# Altium PCB TYPEC_4KRECEIVER-v1.0.PcbDoc (part 5 of 12)
Units mil, origin at the board's own origin, x right, y up, seen from the top; angles counter-clockwise.
Board outline 2834.7 x 1259.84 mil, 10 copper layers (Top Layer, GND-1, Signal L1, GND-2, PWR-1, PWR-2, GND-3, Signal L2, GND-4, Bottom Layer), stack 61.686 mil thick; 492 components, 339 nets, 2214 pads, 1169 vias.
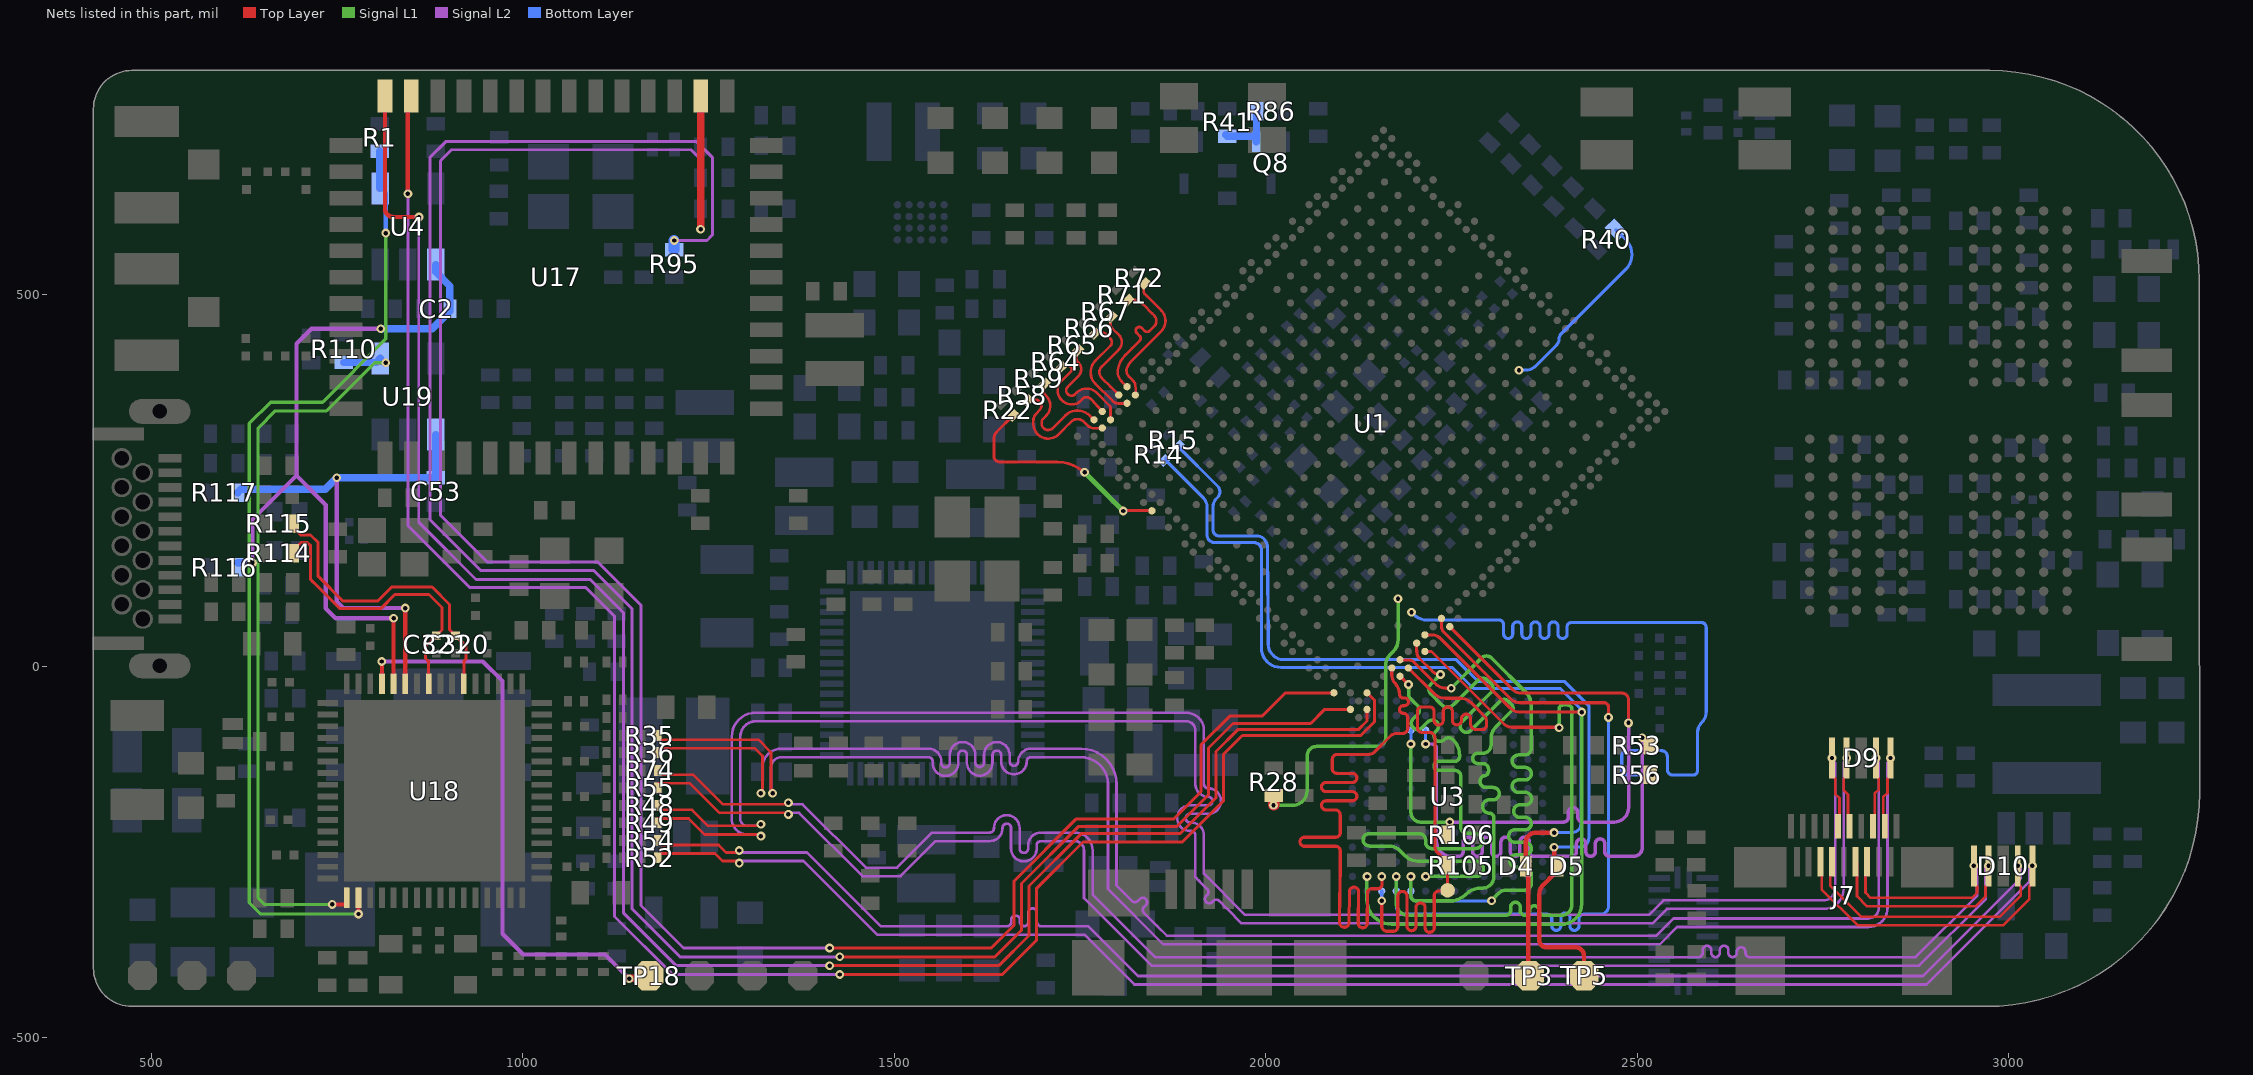
[diagram p11: the nets of this part, all layers, seen from the top]

## Part data (continued)
R100: library part RC0402FR-072KL, "RES 2K OHM 1% 1/16W 0402", Case Code (Imperial)=0402, Case Code (Metric)=1005, LCSC Part Number=C60488, Manufacturer=Yageo, Max Operating Temperature=155°C, Max Power Dissipation=63mW, Min Operating Temperature=-55°C, Package Quantity=1, Resistance Tolerance=1%, Resistor Type="Thick Film", Supplier Part Number=7970452, Temperature Coefficient=100ppm/°C, Voltage Rating=50V, Case/Package=0402, Category="Chip SMD Resistors", ComponentLink1Description=https://datasheet.ciiva.com/11808/0900766b80c66297-11808787.pdf?src-supplier=Rs, ComponentLink1URL=https://datasheet.ciiva.com/11808/0900766b80c66297-11808787.pdf?src-supplier=Rs, ComponentLink2Description=https://datasheet.ciiva.com/11808/0900766b80c66297-11808787.pdf?src-supplier=Rs, ComponentLink2URL=https://datasheet.ciiva.com/11808/0900766b80c66297-11808787.pdf?src-supplier=Rs, ComponentLink3Description=https://datasheet.ciiva.com/7849/1018594-7849934.pdf?src-supplier=Element14, ComponentLink3URL=https://datasheet.ciiva.com/7849/1018594-7849934.pdf?src-supplier=Element14, ComponentLink4Description=https://datasheet.ciiva.com/7849/1018594-7849935.pdf?src-supplier=Element14, ComponentLink4URL=https://datasheet.ciiva.com/7849/1018594-7849935.pdf?src-supplier=Element14, ComponentLink5Description=https://datasheet.ciiva.com/7983/1018594-7983517.pdf?src-supplier=Element14, ComponentLink5URL=https://datasheet.ciiva.com/7983/1018594-7983517.pdf?src-supplier=Element14, ComponentLink6Description=https://datasheet.ciiva.com/2453/pyu-r-int-thick-7-2453635.pdf?src-supplier=Digi-Key, ComponentLink6URL=https://datasheet.ciiva.com/2453/pyu-r-int-thick-7-2453635.pdf?src-supplier=Digi-Key, ComponentLink7Description=https://datasheet.ciiva.com/2453/pyu-r-int-thick-7-2453636.pdf?src-supplier=Digi-Key, ComponentLink7URL=https://datasheet.ciiva.com/2453/pyu-r-int-thick-7-2453636.pdf?src-supplier=Digi-Key, ComponentLink8Description=https://datasheet.ciiva.com/2453/pyu-r-int-thick-7-2453634.pdf?src-supplier=Digi-Key, ComponentLink8URL=https://datasheet.ciiva.com/2453/pyu-r-int-thick-7-2453634.pdf?src-supplier=Digi-Key, ComponentLink9Description=https://datasheet.ciiva.com/12667/pyu-rc0402-51-rohs-l-6-r-12667451.pdf?src-supplier=Mouser, ComponentLink9URL=https://datasheet.ciiva.com/12667/pyu-rc0402-51-rohs-l-6-r-12667451.pdf?src-supplier=Mouser, ComponentLink10Description=https://datasheet.ciiva.com/15189/getdatasheetpartid-358921-15189414.pdf?src-supplier=Verical, ComponentLink10URL=https://datasheet.ciiva.com/15189/getdatasheetpartid-358921-15189414.pdf?src-supplier=Verical, ComponentLink11Description=https://datasheet.ciiva.com/2453/pyu-r-int-thick-7-2453635.pdf?src-supplier=Digikey, ComponentLink11URL=https://datasheet.ciiva.com/2453/pyu-r-int-thick-7-2453635.pdf?src-supplier=Digikey, ComponentLink12Description=https://datasheet.ciiva.com/2453/pyu-r-int-thick-7-2453636.pdf?src-supplier=Digikey, ComponentLink12URL=https://datasheet.ciiva.com/2453/pyu-r-int-thick-7-2453636.pdf?src-supplier=Digikey, ComponentLink13Description=https://datasheet.ciiva.com/2453/pyu-r-int-thick-7-2453634.pdf?src-supplier=Digikey, ComponentLink13URL=https://datasheet.ciiva.com/2453/pyu-r-int-thick-7-2453634.pdf?src-supplier=Digikey, Construction=Rectangular, Depth=0.5mm, Features="Moisture Resistant", Height=0.016inch, Item Type=Resistor, Lead Free=5697LeadFree, Length=0.039inch, Manufacturer Part Number=RC0402FR-072KL, Military Standard=Not, Number of Terminations=2, Packaging="Tape and Reel", Power Rating=63mW, Pricing="10000=0.0018, 100000=0.0011, 200000=0.0017, 300000=0.001, 750000=0.0016, 2000000=0.0009, 2500000=0.0016, 10000000=0.0014 (USD)", Reach SVHC Compliant=Unknown, RoHS=Yes, RoHS Compliant=Yes, Series=RC, Stock=8530000, Supplier="Future Electronics", Technology="THICK FILM", Termination=SMD/SMT, Tolerance=1%, Voltage Rating (DC)=50V, Width=0.02inch, Working Voltage=50V
R101: library part RT0402BRD07100KL, "RES SMD 100K OHM 0.1% 1/16W 0402", LCSC Part Number=C852472, Manufacturer=Yageo, Supplier Part Number=YAG1343CT-ND, Voltage Rating (DC)=50V, Category="Chip SMD Resistors", ComponentLink1Description=https://datasheet.ciiva.com/12724/pyu-rt-1-to-0-05-rohs-l-4-12724954.pdf?src-supplier=Mouser, ComponentLink1URL=https://datasheet.ciiva.com/12724/pyu-rt-1-to-0-05-rohs-l-4-12724954.pdf?src-supplier=Mouser, Item Type=Resistor, Manufacturer Part Number=RT0402BRD07100KL, Pricing="1=0.16, 10=0.121, 50=0.0958, 100=0.0859, 500=0.0654, 1000=0.0578, 5000=0.04283 (USD)", RoHS=Yes, Stock=62932, Supplier=Digikey
R102 R103: library part RC0402FR-07240RL, "RES 240 OHM 1% 1/16W 0402", Case Code (Imperial)=0402, Case Code (Metric)=1005, Manufacturer=Yageo, Max Operating Temperature=155°C, Max Power Dissipation=63mW, Min Operating Temperature=-55°C, Package Quantity=1, Resistance Tolerance=1%, Resistor Type="Thick Film", Supplier Part Number 1=603-RC0402FR-07240RL, Temperature Coefficient=100ppm/°C, Voltage Rating=50V, Case/Package=0402, Category="Chip SMD Resistors", ComponentLink1Description=https://datasheet.ciiva.com/7849/1018594-7849915.pdf?src-supplier=Element14, ComponentLink1URL=https://datasheet.ciiva.com/7849/1018594-7849915.pdf?src-supplier=Element14, ComponentLink2Description=https://datasheet.ciiva.com/7849/1018594-7849916.pdf?src-supplier=Element14, ComponentLink2URL=https://datasheet.ciiva.com/7849/1018594-7849916.pdf?src-supplier=Element14, ComponentLink3Description=https://datasheet.ciiva.com/2519/pyu-r-int-thick-7-2519157.pdf?src-supplier=Digi-Key, ComponentLink3URL=https://datasheet.ciiva.com/2519/pyu-r-int-thick-7-2519157.pdf?src-supplier=Digi-Key, ComponentLink4Description=https://datasheet.ciiva.com/2519/pyu-r-int-thick-7-2519158.pdf?src-supplier=Digi-Key, ComponentLink4URL=https://datasheet.ciiva.com/2519/pyu-r-int-thick-7-2519158.pdf?src-supplier=Digi-Key, ComponentLink5Description=https://datasheet.ciiva.com/2519/pyu-r-int-thick-7-2519156.pdf?src-supplier=Digi-Key, ComponentLink5URL=https://datasheet.ciiva.com/2519/pyu-r-int-thick-7-2519156.pdf?src-supplier=Digi-Key, ComponentLink6Description=https://datasheet.ciiva.com/12669/pyu-rc0402-51-rohs-l-6-r-12669689.pdf?src-supplier=Mouser, ComponentLink6URL=https://datasheet.ciiva.com/12669/pyu-rc0402-51-rohs-l-6-r-12669689.pdf?src-supplier=Mouser, ComponentLink7Description=https://datasheet.ciiva.com/17419/pyu-rc0402-51-rohs-l-6-r-17419482.pdf?src-supplier=Future+Electronics, ComponentLink7URL=https://datasheet.ciiva.com/17419/pyu-rc0402-51-rohs-l-6-r-17419482.pdf?src-supplier=Future+Electronics, Construction=Rectangular, Depth=0.5mm, Features="Moisture Resistant", Height=0.016inch, Lead Free="Lead Free", Length=1mm, Manufacturer Part Number=RC0402FR-07240RL, Military Standard=Not, Number of Terminations=2, Packaging="Tape and Reel", Power Rating=63mW, Pricing 1="1=0.10000, 10=0.01200, 50=0.01200, 100=0.00500, 1000=0.00300, 10000=0.00100 (USD)", REACH SVHC=Unknown, Resistance=240R, RoHS=Yes, RoHS Compliant=Yes, Series=RC, Size Code=0402, Stock 1=1903202, Supplier 1=Mouser, Termination=SMD/SMT, Tolerance=1%, Voltage Rating (DC)=50V, Width=0.02inch
R113 R118: library part RT0402BRD07150KL, "RES 150K OHM 0.1% 1/16W 0402", LCSC Part Number=C852538, Manufacturer=Yageo, Supplier Part Number=3102901, Category="Chip SMD Resistors", Item Type=Resistor, Manufacturer Part Number=RT0402BRD07150KL, Pricing="10000=0.0218, 20000=0.0213, 30000=0.021, 50000=0.0206, 100000=0.0199 (USD)", RoHS=Yes, RoHS Compliant=Yes, Stock=20000, Supplier="Future Electronics"
R129: library part RC0402FR-076K04L, "RES 6.04K OHM 1% 1/16W 0402", Case Code (Imperial)=0402, Case Code (Metric)=1005, LCSC Part Number=C97819, Manufacturer=Yageo, Max Operating Temperature=155°C, Max Power Dissipation=63mW, Min Operating Temperature=-55°C, Package Quantity=10000, Power Rating=62.5mW, Resistance=6.04kR, Resistor Type="Thick Film", Supplier Part Number 1=603-RC0402FR-076K04L, Temperature Coefficient=100ppm/°C, Tolerance=1%, Voltage Rating=50V, Case/Package=0402, Category="Chip SMD Resistors", ComponentLink1Description=https://datasheet.ciiva.com/5558/pyu-rc0402-51-rohs-l-6-r-5558087.pdf?src-supplier=Mouser, ComponentLink1URL=https://datasheet.ciiva.com/5558/pyu-rc0402-51-rohs-l-6-r-5558087.pdf?src-supplier=Mouser, ComponentLink2Description=https://datasheet.ciiva.com/8892/pyu-rc0402-51-rohs-l-6-8892414.pdf?src-supplier=Avnet, ComponentLink2URL=https://datasheet.ciiva.com/8892/pyu-rc0402-51-rohs-l-6-8892414.pdf?src-supplier=Avnet, ComponentLink3Description=https://datasheet.ciiva.com/2552/pyu-r-int-thick-7-2552970.pdf?src-supplier=Digi-Key, ComponentLink3URL=https://datasheet.ciiva.com/2552/pyu-r-int-thick-7-2552970.pdf?src-supplier=Digi-Key, Construction=Rectangular, Contact Plating=Tin,Matte, Depth=0.5mm, Features="Moisture Resistant", Height=0.016inch, Lead Free="Lead Free", Length=1mm, Manufacturer Part Number=RC0402FR-076K04L, Military Standard=Not, Number of Terminations=2, Packaging="Tape and Reel", Pricing 1="1=0.10000, 10=0.01200, 50=0.01200, 100=0.00500, 1000=0.00300, 2500=0.00200, 10000=0.00100 (USD)", RoHS=Yes, RoHS Compliant=Yes, Series=RC, Stock 1=365311, Supplier 1=Mouser, Technology="THICK FILM", Termination=SMD/SMT, Voltage Rating (DC)=50V, Width=0.02inch, Working Voltage=50V
R135 R136 R137 R138 R139: library part RC0402FR-0730KL, "RES 30K OHM 1% 1/16W 0402", Case Code (Imperial)=0402, Case Code (Metric)=1005, Manufacturer=Yageo, Max Operating Temperature=155°C, Max Power Dissipation=63mW, Min Operating Temperature=-55°C, Power Rating=62.5mW, Resistance=30kR, Resistance Tolerance=1%, Resistor Type="Thick Film", Supplier Part Number 1=603-RC0402FR-0730KL, Temperature Coefficient=100ppm/°C, Voltage Rating=50V, Case/Package=0402, Category="Chip SMD Resistors", ComponentLink1Description=https://datasheet.ciiva.com/7849/1018594-7849957.pdf?src-supplier=Element14, ComponentLink1URL=https://datasheet.ciiva.com/7849/1018594-7849957.pdf?src-supplier=Element14, ComponentLink2Description=https://datasheet.ciiva.com/46394/1018594-46394938.pdf?src-supplier=Element14, ComponentLink2URL=https://datasheet.ciiva.com/46394/1018594-46394938.pdf?src-supplier=Element14, ComponentLink3Description=https://datasheet.ciiva.com/12577/pyu-rc0402-51-rohs-l-6-r-12577743.pdf?src-supplier=Mouser, ComponentLink3URL=https://datasheet.ciiva.com/12577/pyu-rc0402-51-rohs-l-6-r-12577743.pdf?src-supplier=Mouser, Construction=Rectangular, Depth=0.5mm, Features="Moisture Resistant", Height=0.35mm, Lead Free="Lead Free", Length=1mm, Manufacturer Part Number=RC0402FR-0730KL, Military Standard=Not, Number of Terminations=2, Packaging="Tape and Reel", Pricing 1="1=0.10000, 10=0.01200, 50=0.01200, 100=0.00500, 1000=0.00300, 2500=0.00200, 10000=0.00100 (USD)", REACH SVHC=Unknown, RoHS=Yes, RoHS Compliant=Yes, Series=RC, Size Code=0402, Stock 1=684954, Supplier 1=Mouser, Termination=SMD/SMT, Tolerance=1%, Voltage Rating (DC)=50V, Weight=2.3E-05oz, Width=0.5mm
R148: library part RC0201FR-071KP, "RES 1K OHM 1% 1/20W 0201", LCSC Part Number=C3953443, Manufacturer=Yageo, Supplier Part Number 1=13-RC0201FR-071KPCT-ND, Manufacturer Part Number=RC0201FR-071KP, Pricing 1="1=0.11000, 10=0.10200, 100=0.03940, 1000=0.01734, 2500=0.01497, 5000=0.01340 (USD)", RoHS=Yes, RoHS Compliant=Yes, Stock 1=4800, Supplier 1=Digi-Key
SW1 SW2 SW3: "SWITCH TACTILE SPST-NO 0.05A 12V", Contact Current Rating=50mA, Contact Resistance=100mR, Insulation Resistance=100MR, LCSC Part Number=C231329, Manufacturer=Omron, Max Operating Temperature=70°C, Max Voltage Rating (DC)=12V, Min Operating Temperature=-25°C, Operating Force=1.5N, Package Quantity=1, Ratings="Dust Proof,IP40", Supplier Part Number 1=SW1020DKR-ND, Actuator Length=0.4mm, Actuator Type=Standard, ComponentLink1Description=http://www.farnell.com/datasheets/60838.pdf?src-supplier=Farnell, ComponentLink1URL=http://www.farnell.com/datasheets/60838.pdf?src-supplier=Farnell, ComponentLink2Description=http://www.farnell.com/datasheets/60838.pdf?src-supplier=Element14, ComponentLink2URL=http://www.farnell.com/datasheets/60838.pdf?src-supplier=Element14, ComponentLink3Description=https://omronfs.omron.com/en_US/ecb/products/pdf/en-b3u.pdf?src-supplier=Digi-Key, ComponentLink3URL=https://omronfs.omron.com/en_US/ecb/products/pdf/en-b3u.pdf?src-supplier=Digi-Key, ComponentLink4Description=http://www.omron.com/ecb/products/pdf/en-b3u.pdf?src-supplier=Digi-Key, ComponentLink4URL=http://www.omron.com/ecb/products/pdf/en-b3u.pdf?src-supplier=Digi-Key, ComponentLink5Description=https://www.distrelec.biz/Web/Downloads/he/et/B3U_eng_datasheet.pdf?mime=application%2Fpdf&src-supplier=Distrelec, ComponentLink5URL=https://www.distrelec.biz/Web/Downloads/he/et/B3U_eng_datasheet.pdf?mime=application%2Fpdf&src-supplier=Distrelec, ComponentLink6Description=http://www.onlinecomponents.com/productFiles/mf-OM/en-b3u.pdf?src-supplier=Onlinecomponents.com, ComponentLink6URL=http://www.onlinecomponents.com/productFiles/mf-OM/en-b3u.pdf?src-supplier=Onlinecomponents.com, ComponentLink7Description=https://www.verical.com/server-webapp/html/getDatasheet?partID=552554&src-supplier=Verical, ComponentLink7URL=https://www.verical.com/server-webapp/html/getDatasheet?partID=552554&src-supplier=Verical, ComponentLink8Description=http://www.farnell.com/datasheets/1685550.pdf?src-supplier=Element14, ComponentLink8URL=http://www.farnell.com/datasheets/1685550.pdf?src-supplier=Element14, ComponentLink9Description=http://www.farnell.com/datasheets/2610940.pdf?src-supplier=Farnell, ComponentLink9URL=http://www.farnell.com/datasheets/2610940.pdf?src-supplier=Farnell, ComponentLink10Description=https://www.alliedelec.com/m/d/4c8a9ef82804fc3c241a13c1e298fd73.pdf?src-supplier=Allied+Electronics, ComponentLink10URL=https://www.alliedelec.com/m/d/4c8a9ef82804fc3c241a13c1e298fd73.pdf?src-supplier=Allied+Electronics, Contact Material=Silver, Current Rating=50mA, Depth=2.5mm, Electrical Life=200000Cycles, Height=1.2mm, Illumination Type=Non-Illuminated,Illuminated, Item Type=Switch, Lead Free="Lead Free", Length=4mm, Manufacturer Part Number=B3U-1000P, Max Current Rating=50mA, Mechanical Life=200000Cycles, Mount="Surface Mount", Orientation=Straight, Packaging="Tape and Reel", Pricing 1="1=1, 10=0.961, 25=0.9064, 50=0.7976, 100=0.7251, 250=0.68888, 500=0.67074, 1000=0.52571 (USD)", REACH SVHC=Unknown, Stock 1=116454, Supplier 1=Digi-Key, Switch Function=Off-Mom, Switch Travel=0.15mm, Termination=SMD/SMT, Throw Configuration=SPST, Voltage Rating (DC)=12V, Weight=0.000776oz, Width=3mm
SW4: "SWITCH TACTILE SPST-NO 0.05A 12V", Actuator Color=Black, Contact Current Rating=50mA, Contact Resistance=500mR, LCSC Part Number=C128539, Manufacturer=Panasonic, Max Operating Temperature=70°C, Max Voltage Rating (DC)=12V, Min Operating Temperature=-20°C, Operating Force=2.2N, Package Quantity=4000, Actuator Length=1mm, Category="Tactile Switches", ComponentLink1Description=https://datasheet.ciiva.com/30117/atv0000ce5-30117313.pdf?src-supplier=Onlinecomponents.com, ComponentLink1URL=https://datasheet.ciiva.com/30117/atv0000ce5-30117313.pdf?src-supplier=Onlinecomponents.com, ComponentLink2Description=https://datasheet.ciiva.com/26945/getdatasheetpartid-65575-26945772.pdf?src-supplier=Verical, ComponentLink2URL=https://datasheet.ciiva.com/26945/getdatasheetpartid-65575-26945772.pdf?src-supplier=Verical, ComponentLink3Description=https://datasheet.ciiva.com/7987/1679731-7987639.pdf?src-supplier=Element14, ComponentLink3URL=https://datasheet.ciiva.com/7987/1679731-7987639.pdf?src-supplier=Element14, ComponentLink4Description=https://datasheet.ciiva.com/8165/atv0000ce5-8165244.pdf?src-supplier=Avnet, ComponentLink4URL=https://datasheet.ciiva.com/8165/atv0000ce5-8165244.pdf?src-supplier=Avnet, ComponentLink5Description=https://datasheet.ciiva.com/2899/atv0000ce5-2899804.pdf?src-supplier=Digikey, ComponentLink5URL=https://datasheet.ciiva.com/2899/atv0000ce5-2899804.pdf?src-supplier=Digikey, ComponentLink6Description=https://datasheet.ciiva.com/2899/atv0000ce5-2899805.pdf?src-supplier=Digikey, ComponentLink6URL=https://datasheet.ciiva.com/2899/atv0000ce5-2899805.pdf?src-supplier=Digikey, ComponentLink7Description=https://datasheet.ciiva.com/2899/atv0000ce5-2899803.pdf?src-supplier=Digikey, ComponentLink7URL=https://datasheet.ciiva.com/2899/atv0000ce5-2899803.pdf?src-supplier=Digikey, Current Rating=50mA, Depth=4.5mm, Electrical Life=100000Cycles, Illumination Type=Non-Illuminated,Illuminated, Item Type="Tactile Switch", Length=6.4mm, Manufacturer Part Number=EVQ-PUA02K, Max Current Rating=50mA, Mechanical Life=100000Cycles, Mounting Technology="Surface Mount", Number of Positions=2NUMBER, Orientation=Straight, Packaging="Tape and Reel", Pricing="1=0.52, 10=0.461, 50=0.461, 100=0.384, 1000=0.335, 10000=0.283 (USD)", Radiation Hardening=No, RoHS=Yes, RoHS Compliant=Yes, Series=EVQPU, Stock=6621, Supplier=Mouser, Switch Function=Off-Mom, Switch Travel=0.3mm, Termination="Gull Wing", Throw Configuration=SPST, Voltage Rating (DC)=12V
TP1 TP2 TP3 TP5 TP6 TP7 TP13 TP16 TP17 TP18: "Test Point ON", Item Type="Test Point", Manufacturer Part Number="TEST POINT 0.5mm Dia"
U1: "BGA-565(15.5x14.4) Microcontrollers (MCU/MPU/SOC) ROHS", LCSC Part Number=C2943786, Manufacturer=Rockchip, Package=BGA-565(15.5x14.4), ComponentLink1Description=LCSC, ComponentLink1URL=https://www.lcsc.com/product-detail/Microcontrollers-MCU-MPU-SOC_Rockchip-RK3566_C2943786.html, Item Type=IC, Manufacturer Part Number=RK3566
U2: "IC INTERFACE SPECIALIZED 24UQFN", Manufacturer="Texas Instruments", Supplier Part Number=595-TPD12S016RKTR, Category="Interface ICs", ComponentLink1Description=https://datasheet.ciiva.com/12545/tpd12s016-108314-12545332.pdf?src-supplier=Mouser, ComponentLink1URL=https://datasheet.ciiva.com/12545/tpd12s016-108314-12545332.pdf?src-supplier=Mouser, ComponentLink2Description=https://datasheet.ciiva.com/14195/tpd12s016-14195158.pdf?src-supplier=Avnet, ComponentLink2URL=https://datasheet.ciiva.com/14195/tpd12s016-14195158.pdf?src-supplier=Avnet, ComponentLink3Description=https://datasheet.ciiva.com/6632/tpd12s016-6632086.pdf?src-supplier=Digikey, ComponentLink3URL=https://datasheet.ciiva.com/6632/tpd12s016-6632086.pdf?src-supplier=Digikey, Manufacturer Part Number=TPD12S016RKTR, Pricing="1=0.82, 10=0.694, 50=0.694, 100=0.537, 1000=0.443, 10000=0.442 (USD)", RoHS=Yes, Stock=5223, Supplier=Mouser
U3: "eMMC 5.1 FBGA-153 eMMC ROHS", LCSC Part Number=C499919, Manufacturer=Samsung, Package=FBGA-153, ComponentLink1Description=LCSC, ComponentLink1URL=https://www.lcsc.com/product-detail/eMMC_Samsung-KLMAG1JETD-B041_C499919.html, Item Type=IC, Manufacturer Part Number=KLMAG1JETD-B041
U4 U19: "SOT-23-5 Power Distribution Switches ROHS", LCSC Part Number=C55136, Manufacturer=Silergy, Category="USB Interface ICs", Item Type=IC, Manufacturer Part Number=SY6280AAC, RoHS=No, Stock=3000, Supplier=Avnet, Supplier Part Number=SY6280AAC
U5: "Step-down type CSP1.56*1.96-20 DC-DC Converters ROHS", LCSC Part Number=C178249, Manufacturer=Silergy, Manufacturer Part Number=SYR838PKC, RoHS=Yes, Supplier 1=Avnet, Supplier Part Number 1=SYR838PKC
U6: "Step-down type 3.8V~36V 5A ESOP-8 DC-DC Converters ROHS", LCSC Part Number=C509400, Manufacturer=SCT, Item Type=IC, Manufacturer Part Number=SCT2450STER, RoHS=No, Supplier=LCSC
U7: "QFN-68-EP(7x7) Power Management Specialized - PMIC ROHS", LCSC Part Number=C2939628, Manufacturer=Rockchip, Package=QFN-68-EP(7x7), ComponentLink1Description=LCSC, ComponentLink1URL=https://www.lcsc.com/product-detail/Power-Management-Specialized-PMIC_Rockchip-RK809-5_C2939628.html, Item Type=IC, Manufacturer Part Number=RK809-5
U8: "IC CURRENT SWITCH SOT23-3", LCSC Part Number=C500764, Manufacturer=Diodes, Supplier Part Number=AP2331SA-7DICT-ND, Category="Hot Swap Controllers", ComponentLink1Description=https://datasheet.ciiva.com/15108/getdatasheetpartid-670771-15108880.pdf?src-supplier=Verical, ComponentLink1URL=https://datasheet.ciiva.com/15108/getdatasheetpartid-670771-15108880.pdf?src-supplier=Verical, ComponentLink2Description=https://datasheet.ciiva.com/4923/ap2331-6844-4923636.pdf?src-supplier=Mouser, ComponentLink2URL=https://datasheet.ciiva.com/4923/ap2331-6844-4923636.pdf?src-supplier=Mouser, ComponentLink3Description=https://datasheet.ciiva.com/8142/ap2331-8142774.pdf?src-supplier=Avnet, ComponentLink3URL=https://datasheet.ciiva.com/8142/ap2331-8142774.pdf?src-supplier=Avnet, ComponentLink4Description=https://datasheet.ciiva.com/1962/ap2331-1962167.pdf?src-supplier=Digikey, ComponentLink4URL=https://datasheet.ciiva.com/1962/ap2331-1962167.pdf?src-supplier=Digikey, ComponentLink5Description=https://datasheet.ciiva.com/1962/ap2331-1962168.pdf?src-supplier=Digikey, ComponentLink5URL=https://datasheet.ciiva.com/1962/ap2331-1962168.pdf?src-supplier=Digikey, ComponentLink6Description=https://datasheet.ciiva.com/1962/ap2331-1962169.pdf?src-supplier=Digikey, ComponentLink6URL=https://datasheet.ciiva.com/1962/ap2331-1962169.pdf?src-supplier=Digikey, Item Type=IC, Manufacturer Part Number=AP2331SA-7, Pricing="1=0.45, 10=0.383, 25=0.3572, 100=0.2859, 250=0.26548, 500=0.22464, 1000=0.17359 (USD)", RoHS=Yes, Stock=19607, Supplier=Digikey
U11: "Step-down type SOT-23-5 DC-DC Converters ROHS", LCSC Part Number=C78988, Manufacturer=Silergy, ComponentLink1Description=LCSC, ComponentLink1URL=https://www.lcsc.com/product-detail/DC-DC-Converters_Silergy-Corp-SY8089AAAC_C78988.html, Item Type=IC, Manufacturer Part Number=SY8089AAAC, RoHS=No, Supplier 1=LCSC, Supplier Part Number 1=C78988
U12: "FBGA-200 DDR SDRAM ROHS", LCSC Part Number=C2920249, Manufacturer=Samsung, Item Type=IC, Manufacturer Part Number=K4U6E3S4AA-MGCL, Pricing="1=9.1076, 10=7.9029, 30=7.1674, 128=6.5516 (USD)", RoHS=No, Stock=962, Supplier=LCSC
U16: "IC REG BUCK ADJ 2A SOT23-5", LCSC Part Number=C141836, Manufacturer="Texas Instruments", ComponentLink1Description=http://www.ti.com/lit/ds/symlink/tlv62569.pdf?src-supplier=Farnell, ComponentLink1URL=http://www.ti.com/lit/ds/symlink/tlv62569.pdf?src-supplier=Farnell, ComponentLink2Description=http://www.ti.com/lit/ds/symlink/tlv62569.pdf?src-supplier=Digikey, ComponentLink2URL=http://www.ti.com/lit/ds/symlink/tlv62569.pdf?src-supplier=Digikey, Item Type=IC, Manufacturer Part Number=TLV62569DBVR, Pricing="1=0.47, 10=0.248, 50=0.248, 100=0.143, 1000=0.12, 10000=0.086 (USD)", RoHS=Yes, Stock=6385, Supplier=Mouser
U17: "-86dBm 14dBm 2.4GHz - WiFi Modules ROHS", LCSC Part Number=C2918717, Manufacturer="AMPAK Tech", Package=Custom, ComponentLink1Description=LCSC, ComponentLink1URL=https://www.lcsc.com/product-detail/WiFi-Modules_AMPAK-Tech-AP6275S_C2918717.html, Item Type=Module, Manufacturer Part Number=AP6275S
U18: "HD-DVI2.0 to DP1.2 with Type-C", LCSC Part Number=-, Manufacturer=Lontium, Package="QFN 64 (7.5x7.5)", ComponentLink1Description=LCSC, Item Type=IC, Manufacturer Part Number=LT6711
X1: library part XDMCZLNDDF-0.032768MHZ, "32.768kHz 贴片晶振 12.5pF ±20ppm ±20ppm SMD3215-2P Crystals ROHS", LCSC Part Number=C521573, Manufacturer="TAITIEN Elec", Package=SMD3215-2P, ComponentLink1Description=LCSC, ComponentLink1URL=https://www.lcsc.com/product-detail/Crystals_TAITIEN-Elec-XDMCZLNDDF-0-032768MHZ_C521573.html, Item Type=Crystal, Manufacturer Part Number=XDMCZLNDDF-0.032768MHZ
X2: library part X322524MOB4SI, "24MHz SMD Crystal Resonator 12pF ±10ppm ±30ppm -40℃~+85℃ SMD3225-4P Crystals ROHS", LCSC Part Number=C70590, Manufacturer="Yangxing Tech", ComponentLink1Description=LCSC, ComponentLink1URL=https://www.lcsc.com/product-detail/Crystals_Yangxing-Tech-X322524MOB4SI_C70590.html, Item Type=Crystal, Manufacturer Part Number=X322524MOB4SI
X3: library part Q22FA12800078, "37.4MHz SMD Crystal Resonator 9pF 60Ω ±10ppm -40℃~+85℃ SMD2016-4P Crystals", LCSC Part Number=C255897, Manufacturer=Seiko, ComponentLink1Description=LCSC, ComponentLink1URL=https://www.lcsc.com/product-detail/Crystals_Seiko-Epson-Q22FA12800078_C255897.html, Manufacturer Part Number=Q22FA12800078
X5: library part SX3M32.768KD10F20TLN, "1.8V ±10ppm ±20ppm CMOS 32.768kHz SMD3225-4P Crystal Oscillators ROHS", LCSC Part Number=C21547574, Manufacturer="Shenzhen SCTF Elec", Package=SMD3225-4P, ComponentLink1Description=LCSC, ComponentLink1URL=https://www.lcsc.com/product-detail/Crystal-Oscillators_Shenzhen-SCTF-Elec-SX3M32-768KD10F20TLN_C21547574.html, Item Type="Crystal Oscillator", Manufacturer Part Number=SX3M32.768KD10F20TLN
X6: library part NX2520SA-27MHZ-STD-CSW-5, "SMD2520-4P Crystals ROHS", Case/Package=SMD/SMT, ESR (Equivalent Series Resistance)=70kR, Frequency=32.768kHz, Frequency Tolerance=20ppm, LCSC Part Number=C910047, Load Capacitance=6pF, Manufacturer=NDK, Max Operating Temperature=85°C, Min Operating Temperature=-40°C, Supplier Part Number 1=1847854, Category=Crystals, Item Type=Crystal, Manufacturer Part Number=NX2520SA-27MHZ-STD-CSW-5, Mounting Technology="Surface Mount", Packaging="Cut Tape", Pricing 1="5=0.15520, 50=0.68600, 100=0.66600, 250=0.65000, 500=0.63400 (GBP)", RoHS=Yes, RoHS Compliant=Yes, Series=NX3215SA, Stock 1=500, Supplier 1=Rs

## Free pads (board coordinates)
  round 19.68 smd: 2(2244.94,-301.97)

## Via types
v1: diameter 11.81, hole 5.91, Top Layer to Bottom Layer, tented both sides, 698 vias
v2: diameter 15.75, hole 7.87, Top Layer to Bottom Layer, tented both sides, 248 vias
v3: diameter 11.81, hole 5.91, Top Layer to Signal L1, tented both sides, 121 vias
v4: diameter 11.81, hole 5.91, Top Layer to Bottom Layer, 44 vias
v5: diameter 11.81, hole 5.91, Signal L2 to Bottom Layer, 41 vias
v6: diameter 11.81, hole 5.91, Top Layer to Signal L1, 17 vias

## Nets (pads, with @x,y where several pads share a name; then routed paths per layer and width w, separated by ;. In a path a pad name is that pad's centre, name@x,y a point inside that pad or via, vN(x,y) a via of type N, cw(c..) or ccw(c..) an arc to the next point about the centre after c; other vN are vias at no path point)
#CLK_N: D10.5 D10.6 J7.14 R52.2 | length 2393.4
  Top Layer w3.5: R52.2@1181.9,-258.2 1181.9,-256.23 1185.47,-252.66 1187.24,-252.66 1187.52,-252.39 1258.96,-252.39 1269.09,-262.52 1291.71,-262.52 v4(1291.71,-265.25) ; J7.14@2746.66,-263.51 2748.53,-265.39 2748.53,-300.71 2796.61,-348.79 2992.97,-348.79 3028.02,-313.74 3028.02,-296.67 3032.11,-292.58 D10.5@3032.11,-284.71
  Signal L2 w3.5: v4(1291.71,-265.25) 1291.71,-262.52 1378.04,-262.52 1477.18,-361.66 1756.44,-361.66 1823.46,-428.68 2889.42,-428.68 3028.02,-290.08 3028.02,-268.96 v4(3032.11,-268.96)
#CLK_P: D10.4 D10.7 J7.12 R54.2 | length 2393.4
  Top Layer w3.5: R54.2@1181.9,-234.98 1181.9,-237.28 1185.47,-240.84 1187.47,-240.84 1187.52,-240.89 1263.73,-240.89 1273.85,-251.02 1291.71,-251.02 v4(1291.71,-248.28) ; J7.12@2762.41,-263.51 2760.03,-265.89 2760.03,-295.94 2801.38,-337.29 2988.2,-337.29 3016.52,-308.98 3016.52,-296.67 3012.43,-292.58 D10.4@3012.43,-284.71
  Signal L2 w3.5: v4(1291.71,-248.28) 1291.71,-251.02 1382.8,-251.02 1481.94,-350.16 1616.64,-350.16 1652.01,-350.16 ccw(c1652.01,-344.41) 1657.76,-344.41 1657.76,-341.63 cw(c1663.51,-341.63) 1669.26,-341.63 1669.26,-344.41 ccw(c1675.01,-344.41) 1680.76,-344.41 1680.76,-331.96 cw(c1686.51,-331.96) 1692.26,-331.96 1692.26,-344.41 ccw(c1698.01,-344.41) 1698.01,-350.16 1711.26,-350.16 1761.21,-350.16 1828.23,-417.18 2884.66,-417.18 3016.52,-285.31 3016.52,-268.96 v4(3012.43,-268.96)
#HDMI_TX0_N: R67.1 U1.AR33 | length 127.3
  Top Layer w3.5: 1776.83,398.55 ccw(c1787.82,395.15) 1776.33,395.69 ccw(c1787.82,395.15) 1776.32,395.39 ccw(c1787.82,395.15) 1776.32,395.28 ccw(c1786.84,395.28) 1779.4,387.85 1791.73,375.52 1792.26,374.99 ; 1776.92,398.82 cw(c1787.82,395.15) 1779.69,403.29 1802.53,426.13 ccw(c1792.64,436.01) 1806.62,436.01 ccw(c1793.57,436.01) 1802.81,445.23 1794.11,453.93 cw(c1800.9,460.73) 1793.72,454.34 cw(c1800.9,460.73) 1792.27,456.49 cw(c1800.9,460.73) 1791.29,460.73 cw(c1812.56,463.44) 1791.12,463.37 R67.1@1791.12,463.44 ; 1791.02,376.19 U1.AR33@1802.41,364.8
#HDMI_TX0_P: R66.1 U1.AP33 | length 151.6
  Top Layer w3.5: R66.1@1770.01,447.37 1771.4,448.76 1776.44,448.76 1776.53,448.67 1779.8,448.67 cw(c1779.8,440.78) 1785.39,446.36 1791.18,440.57 cw(c1786.42,435.81) 1791.18,431.04 1770.5,410.36 ccw(c1785.22,395.95) 1767.07,405.69 ccw(c1785.22,395.95) 1764.64,395.12 1764.65,394.97 1764.68,394.08 ccw(c1784.16,394.33) 1770.43,380.51 1794.3,356.65 ccw(c1802.41,364.8) 1801.59,353.33 1813.21,353.33 U1.AP33@1813.55,353.66
#HDMI_TX1_N: R65.1 U1.AP35 | length 157.1
  Top Layer w3.5: R65.1@1747.51,424.87 ccw(c1753.13,419.25) 1745.18,419.25 1745.18,414.57 ccw(c1752.91,414.57) 1747.45,409.1 1747.96,408.59 ; 1748.1,408.46 cw(c1738.64,399.33) 1747.77,389.86 1733.5,375.59 ccw(c1738.12,370.89) 1731.53,370.99 ccw(c1738.65,371.11) 1733.56,366.12 ccw(c1739.18,371.65) 1739.02,363.77 ccw(c1739.06,367.27) 1739.31,363.78 ccw(c1738.75,370.58) 1743.57,365.75 1745.79,367.97 cw(c1758.48,355.28) 1758.48,373.22 1760.03,373.22 cw(c1760.03,356.11) 1772.13,368.21 1790.25,350.09 cw(c1787.77,347.61) 1791.27,347.61 U1.AP35@1791.27,331.39
#HDMI_TX1_P: R64.1 U1.AR35 | length 134.2
  Top Layer w3.5: 1720.03,370.66 ccw(c1738.65,371.11) 1725.45,357.97 ; 1720.03,370.89 cw(c1738.12,370.89) 1725.33,383.68 1731.6,389.95 1737.83,396.18 ; R64.1@1725.01,402.37 cw(c1729.45,397.93) 1729.45,404.21 1733.78,404.21 cw(c1733.78,398.33) 1737.94,402.49 cw(c1734.77,399.32) 1739.24,399.6 cw(c1734.41,399.6) 1737.87,396.22 ; 1725.48,357.94 ccw(c1739.2,371.65) 1739.2,352.25 1740.24,352.25 ccw(c1740.24,366.98) 1750.65,356.57 1753.57,359.48 cw(c1758.97,354.09) 1758.97,361.72 cw(c1758.97,353.56) 1763.17,360.56 cw(c1758.97,353.56) 1764.75,359.33 U1.AR35@1780.14,342.53
#HDMI_TX2_N: R59.1 U1.AR36 | length 149.5
  Top Layer w3.5: 1701.45,319.92 cw(c1708.84,327.18) 1699.34,331.29 1704.93,337.35 1705.38,337.82 ccw(c1692.41,350.23) 1705.61,362.39 1704.63,363.46 1702.91,365.32 cw(c1705.47,367.7) 1702.46,365.91 cw(c1710.73,370.74) 1701.16,370.74 1701.16,373.4 1701.12,373.44 1701.12,378.48 R59.1@1702.51,379.87 ; 1701.57,319.82 ccw(c1707.35,326.22) 1711.41,318.61 1712.09,318.97 ccw(c1710.43,322.05) 1712.89,319.56 1730.57,337.24 cw(c1746.58,321.23) 1746.6,343.87 cw(c1746.58,319.87) 1750.65,343.53 1753.02,343.13 cw(c1746.82,320.79) 1763.21,337.18 U1.AR36@1769,331.39
#HDMI_TX2_P: R58.1 U1.AP36 | length 169.3
  Top Layer w3.5: R58.1@1680.01,357.1 1685.05,357.1 1686.54,358.58 1690.35,358.58 cw(c1690.35,351.97) 1695.02,356.65 ; 1695.02,356.65 1696.96,354.71 cw(c1690.49,350.19) 1696.96,345.66 1690.89,339.09 ccw(c1699.34,331.29) 1688.75,335.78 ccw(c1708.84,327.18) 1693.34,311.77 ccw(c1697.4,315.84) 1693.41,311.71 ccw(c1703.93,322.4) 1693.69,311.44 ccw(c1697.65,315.6) 1693.75,311.38 ccw(c1707.35,326.22) 1716.82,308.46 1717.49,308.82 ccw(c1710.43,322.05) 1720.99,311.4 1729.55,319.96 ; 1729.61,320.01 1738.7,329.11 cw(c1746.58,321.23) 1746.58,332.37 cw(c1746.58,319.87) 1755.41,328.72 1758.45,325.68 1760.94,323.19 ccw(c1768.97,331.32) 1768.97,319.89 U1.AP36@1780.14,320.26
#HDMI_TXCLK_N: R72.1 U1.AP32 | length 185.8
  Top Layer w3.5: 1821.6,384.14 1821.3,384.44 1817.02,388.71 1816.18,389.56 cw(c1824.74,398.04) 1812.69,397.61 cw(c1816.19,397.68) 1812.78,398.46 cw(c1837.52,392.55) 1815.79,405.77 cw(c1837.52,392.55) 1819.58,410.58 1859.17,450.17 ccw(c1844.49,464.88) 1865.28,464.86 ccw(c1846.33,464.88) 1859.73,478.29 1840.22,497.79 1837.54,500.47 cw(c1841.68,504.61) 1835.83,504.59 1835.83,508.15 1836.12,508.44 1835.83,508.73 R72.1@1837.51,514.87 ; 1821.62,384.12 cw(c1813.55,375.93) 1821.73,384.01 cw(c1813.55,375.93) 1824.71,378.69 cw(c1821.31,377.87) 1824.8,378.04 1825.04,372.99 cw(c1821.55,372.82) 1825.05,372.82 1825.05,371.17 U1.AP32@1824.68,364.8
#HDMI_TXCLK_P: R71.1 U1.AR32 | length 185.6
  Top Layer w3.5: U1.AR32@1813.55,375.93 1806.18,383.16 cw(c1819.13,396.11) 1800.82,396.11 1800.82,398.21 cw(c1838.25,391.81) 1811.41,418.67 1820.06,427.32 1830.47,437.73 ccw(c1827.11,441.09) 1830.47,444.45 1826.72,448.21 cw(c1830.08,451.56) 1826.72,454.92 cw(c1830.08,451.56) 1833.44,454.92 1837.19,451.17 ccw(c1840.55,454.53) 1843.91,451.17 1850.17,457.43 1850.61,457.9 ccw(c1843.1,464.51) 1851.66,459.33 ccw(c1843.1,464.51) 1851.86,459.69 ccw(c1843.1,464.5) 1850.17,471.58 1847.24,474.5 1835.48,486.27 1835.16,486.59 ccw(c1817.77,468.92) 1821.16,493.48 R71.1@1815.01,492.37
#TX0_N: D9.1 D9.10 J7.11 R49.2 | length 2393.4
  Top Layer w3.5: R49.2@1181.9,-211.08 1181.9,-205.22 1223.44,-205.22 1244.96,-226.74 1320.7,-226.74 v4(1320.7,-228.89) ; D9.1@2762.41,-139.5 2762.41,-147.37 2766.5,-151.47 2766.5,-171.98 2772.4,-177.88 2772.4,-213.36 J7.11@2770.28,-215.48
  Signal L2 w3.5: v4(1320.7,-228.89) 1320.7,-226.74 1302.33,-226.74 cw(c1302.33,-205.93) 1296.83,-226 cw(c1302.33,-205.93) 1282.27,-211.43 cw(c1302.33,-205.93) 1281.53,-205.93 1281.53,-95.13 cw(c1313.74,-95.13) 1313.74,-62.91 1893.24,-62.91 cw(c1893.24,-86.68) 1917.01,-86.68 1917.01,-136.84 1917.01,-158.85 ccw(c1922.76,-158.85) 1922.76,-164.6 cw(c1922.76,-181.85) 1922.76,-199.1 1898.24,-199.1 ccw(c1898.24,-204.85) 1898.24,-210.6 1899.76,-210.6 cw(c1899.76,-227.85) 1917.01,-227.85 1917.01,-235.36 1917.01,-279.29 1972.59,-334.87 2515.94,-334.87 2535.43,-315.38 2750.88,-315.38 ccw(c2750.88,-299.76) 2766.5,-299.76 2766.5,-129.96 2762.41,-125.86 v4(2762.41,-123.75)
#TX0_P: D9.2 D9.9 J7.9 R48.2 | length 2393.4
  Top Layer w3.5: R48.2@1181.9,-187.86 1181.9,-193.72 1228.2,-193.72 1249.72,-215.24 1320.7,-215.24 v4(1320.7,-213.08) ; D9.2@2782.09,-139.5 2782.09,-147.37 2778,-151.47 2778,-167.22 2783.9,-173.12 2783.9,-213.36 J7.9@2786.03,-215.48
  Signal L2 w3.5: v4(1320.7,-213.08) 1320.7,-215.24 1302.49,-215.24 cw(c1302.49,-205.78) 1293.03,-205.78 1293.03,-95.13 cw(c1313.74,-95.13) 1313.74,-74.41 1893.24,-74.41 cw(c1893.24,-86.68) 1905.51,-86.68 1905.51,-158.85 ccw(c1922.76,-158.85) 1922.76,-176.1 cw(c1922.76,-181.85) 1922.76,-187.6 1898.24,-187.6 ccw(c1898.24,-204.85) 1898.24,-222.1 1899.76,-222.1 cw(c1899.76,-227.85) 1905.51,-227.85 1905.51,-284.05 1909.99,-288.53 1911.23,-289.77 1921.43,-299.98 cw(c1917.37,-304.05) 1921.48,-308.07 1919.99,-309.59 ccw(c1924.1,-313.61) 1920.07,-317.72 ccw(c1924.1,-313.61) 1928.2,-317.63 1929.53,-316.29 cw(c1933.63,-320.31) 1937.7,-316.24 1947.57,-326.12 1948.81,-327.36 1967.82,-346.37 2520.7,-346.37 2540.19,-326.88 2750.88,-326.88 ccw(c2750.88,-299.76) 2778,-299.76 2778,-129.96 2782.09,-125.86 v4(2782.09,-123.75)
#TX1_N: D10.2 D10.9 J7.8 R55.2 | length 2393.4
  Top Layer w3.5: R55.2@1181.9,-163.84 1181.9,-157.98 1225.04,-157.98 1264.78,-197.72 1357.73,-197.72 v4(1357.73,-199.79) ; J7.8@2793.9,-263.51 2796.02,-265.64 2796.02,-309.89 2809.71,-323.57 2955.49,-323.57 2968.96,-310.1 2968.96,-296.67 2973.06,-292.58 D10.2@2973.06,-284.71
  Signal L2 w3.5: v4(1357.73,-199.79) cw(c1359.88,-199.79) 1359.88,-197.63 1372.06,-197.63 1457.23,-282.81 1508.61,-282.81 1555.75,-235.67 1621.14,-235.67 1628.64,-235.67 ccw(c1628.64,-218.42) 1645.89,-218.42 1645.89,-217.9 cw(c1651.64,-217.9) 1657.39,-217.9 1657.39,-245.78 ccw(c1674.64,-245.78) 1691.89,-245.78 1691.89,-241.42 cw(c1697.64,-241.42) 1697.64,-235.67 1730.9,-235.67 1743.28,-235.67 cw(c1743.28,-248.05) 1755.66,-248.05 1755.66,-312.41 1846.59,-403.34 2879.69,-403.34 2968.96,-314.07 2968.96,-268.96 v4(2973.06,-268.96)
#TX1_P: D10.1 D10.10 J7.6 R74.2 | length 2393.4
  Top Layer w3.5: R74.2@1181.9,-140.62 1181.9,-146.48 1229.8,-146.48 1269.54,-186.22 1357.73,-186.22 v4(1357.73,-183.98) ; J7.6@2809.65,-263.51 2807.52,-265.64 2807.52,-305.12 2814.47,-312.07 2950.72,-312.07 2957.46,-305.33 2957.46,-296.67 2953.37,-292.58 D10.1@2953.37,-284.71
  Signal L2 w3.5: v4(1357.73,-183.98) ccw(c1359.88,-183.98) 1359.88,-186.13 1376.82,-186.13 1462,-271.31 1503.85,-271.31 1550.99,-224.17 1621.14,-224.17 1628.64,-224.17 ccw(c1628.64,-218.42) 1634.39,-218.42 1634.39,-217.9 cw(c1651.64,-217.9) 1668.89,-217.9 1668.89,-245.78 ccw(c1674.64,-245.78) 1680.39,-245.78 1680.39,-241.42 cw(c1697.64,-241.42) 1697.64,-224.17 1730.9,-224.17 1743.28,-224.17 cw(c1743.28,-248.05) 1767.16,-248.05 1767.16,-307.65 1851.36,-391.84 2580.88,-391.84 2582.63,-391.84 ccw(c2582.63,-386.09) 2588.38,-386.09 2588.38,-382.3 cw(c2594.13,-382.3) 2599.88,-382.3 2599.88,-386.09 ccw(c2605.63,-386.09) 2611.38,-386.09 2611.38,-382.3 cw(c2617.13,-382.3) 2622.88,-382.3 2622.88,-386.09 ccw(c2628.63,-386.09) 2634.38,-386.09 2634.38,-384.38 cw(c2640.13,-384.38) 2645.88,-384.38 2645.88,-386.09 ccw(c2651.63,-386.09) 2651.63,-391.84 2660.72,-391.84 2874.92,-391.84 2957.46,-309.3 2957.46,-268.96 v4(2953.37,-268.96)
#TX2_N: D9.4 D9.7 J7.5 R36.2 | length 2393.4
  Top Layer w3.5: R36.2@1181.9,-116.59 1181.9,-110.73 1312.67,-110.73 1322.85,-120.92 1322.85,-171.22 v4(1320.7,-171.22) ; J7.5@2817.52,-215.48 2819.64,-213.36 2819.64,-171.84 2825.55,-165.93 2825.55,-151.47 2821.46,-147.37 D9.4@2821.46,-139.5
  Signal L2 w3.5: v4(1320.7,-171.22) 1322.85,-171.22 1322.85,-136.59 cw(c1348.21,-136.59) 1348.21,-111.23 1546.24,-111.23 cw(c1546.24,-128.48) 1563.49,-128.48 1563.49,-130.63 ccw(c1569.24,-130.63) 1574.99,-130.63 1574.99,-119.6 cw(c1592.24,-119.6) 1609.49,-119.6 1609.49,-130.26 ccw(c1615.24,-130.26) 1620.99,-130.26 1620.99,-119.6 cw(c1638.24,-119.6) 1655.49,-119.6 1655.49,-128.48 ccw(c1661.24,-128.48) 1666.99,-128.48 cw(c1684.24,-128.48) 1684.24,-111.23 1751.49,-111.23 cw(c1751.49,-159.1) 1799.36,-159.1 1799.36,-295.39 1818.86,-314.89 1820.1,-316.13 ccw(c1824.16,-312.06) 1828.23,-316.13 1830.67,-313.68 cw(c1834.74,-317.75) 1838.81,-313.68 cw(c1834.74,-317.75) 1838.81,-321.82 1836.36,-324.26 ccw(c1840.43,-328.33) 1836.36,-332.39 1853.95,-349.98 1866.97,-363 2525.94,-363 2549.13,-339.81 2811.09,-339.81 ccw(c2811.09,-325.35) 2825.55,-325.35 2825.55,-129.96 2821.46,-125.86 v4(2821.46,-123.75)
#TX2_P: D9.5 D9.6 J7.3 R35.2 | length 2393.4
  Top Layer w3.5: R35.2@1181.9,-93.37 1181.9,-99.23 1317.43,-99.23 1334.35,-116.15 1334.35,-171.22 v4(1336.51,-171.22) ; J7.3@2833.27,-215.48 2831.14,-213.36 2831.14,-176.6 2837.05,-170.69 2837.05,-151.47 2841.15,-147.37 D9.5@2841.15,-139.5
  Signal L2 w3.5: v4(1336.51,-171.22) 1334.35,-171.22 1334.35,-136.59 cw(c1348.21,-136.59) 1348.21,-122.73 1546.24,-122.73 cw(c1546.24,-128.48) 1551.99,-128.48 1551.99,-130.63 ccw(c1569.24,-130.63) 1586.49,-130.63 1586.49,-119.6 cw(c1592.24,-119.6) 1597.99,-119.6 1597.99,-130.26 ccw(c1615.24,-130.26) 1632.49,-130.26 1632.49,-119.6 cw(c1638.24,-119.6) 1643.99,-119.6 1643.99,-128.48 ccw(c1661.24,-128.48) 1678.49,-128.48 cw(c1684.24,-128.48) 1684.24,-122.73 1751.49,-122.73 cw(c1751.49,-159.1) 1787.86,-159.1 1787.86,-300.15 1862.21,-374.5 2530.7,-374.5 2553.89,-351.31 2811.09,-351.31 ccw(c2811.09,-325.35) 2837.05,-325.35 2837.05,-129.96 2841.15,-125.86 v4(2841.15,-123.75)
AUX_N: C320.2 R115.1 U18.22 | length 417.6
  Top Layer w4.1: R115.1@690.09,190.99 690.09,187.49 697.04,180.54 697.23,180.54 701.38,176.39 714.52,176.39 724.78,166.14 724.78,120.68 757.68,87.78 805.35,87.78 823.88,106.31 878.22,106.31 901.68,82.84 901.68,48.88 C320.2@909.8,40.76 923.99,26.57 923.99,9.46 920.8,6.27 U18.22@920.8,-23.78
AUX_P: C321.2 R114.1 U18.25 | length 401.2
  Top Layer w4.1: R114.1@690.09,151.69 690.09,155.19 697.04,162.14 697.79,162.14 701.94,166.29 710.34,166.29 714.68,161.95 714.68,116.5 717.64,113.54 720.6,110.58 747.58,83.6 753.5,77.68 809.54,77.68 828.06,96.21 874.03,96.21 891.58,78.66 891.58,48.53 884.01,40.96 C321.2@883.81,40.96 ; U18.25@873.56,-23.78 873.56,5.9 869.29,10.17 869.29,26.24 C321.2@883.81,40.76
BT_HOST_WAKE: U1.A37 U17.50 | length 2602.5
  Top Layer w4: v1(1413.13,-403.36) 1640.69,-403.36 1681.47,-362.59 1681.47,-296.03 1751.77,-225.72 1884.92,-225.72 1933.18,-177.46 1933.18,-114.95 1962.47,-85.66 2124.78,-85.66 2136.48,-73.97 U1.A37@2136.48,-58.35
  Top Layer w6: U17.50@814.78,767.13 814.78,615.41 ccw(c825.83,615.41) 818.52,607.13 ccw(c825.83,615.41) 825.83,604.36 v1(860.47,604.36)
  Signal L2 w4: v1(860.47,604.36) 860.21,604.09 860.21,193.52 937.38,116.35 1091.15,116.35 1135.55,71.95 1135.55,-332.08 1206.84,-403.36 v1(1413.13,-403.36)
BT_REG_ON: U1.D38 U17.38 | length 3006.6
  Top Layer w4: v1(1413.13,-379.55) 1630.83,-379.55 1661.47,-348.91 1661.47,-289.58 1745.33,-205.72 1876.63,-205.72 1913.18,-169.18 1913.18,-106.15 1951.77,-67.56 1995.24,-67.56 2026.72,-36.08 U1.D38@2091.93,-36.08
  Top Layer w6: U17.38@1239.56,766.72 U17.38@1239.98,767.13
  Top Layer w10: v1(1239.56,587.73) U17.38@1239.56,766.72
  Signal L2 w4: v1(1239.56,587.73) 1239.56,681.93 1226.65,694.85 904.44,694.85 889.6,680.01 889.6,202.86 952.2,140.26 1100.91,140.26 1159.36,81.81 1159.36,-322.22 1216.7,-379.55 v1(1413.13,-379.55)
BT_WAKE: U1.B36 U17.49 | length 2629.6
  Top Layer w4: v1(1426.96,-415.27) 1645.62,-415.27 1691.47,-369.42 1691.47,-299.8 1754.4,-236.87 1887.91,-236.87 1943.18,-181.6 1943.18,-119.09 1968.61,-93.66 2128.1,-93.66 2146.9,-74.86 2146.9,-46.5 U1.B36@2136.48,-36.08
  Top Layer w6: v1@845.49,635.91 845.49,762.4 U17.49@850.21,767.13
  Signal L2 w4: v1(845.63,635.63) 845.63,188.89 929.18,105.35 1085.31,105.35 1123.65,67.02 1123.65,-337.01 1201.91,-415.27 v1(1426.96,-415.27)
CLK32K_OUT1_WIFI: R95.1 U1.B38 | length 2987.8
  Top Layer w4: v1(1426.96,-391.46) 1635.76,-391.46 1671.47,-355.75 1671.47,-292.62 1748.37,-215.72 1880.78,-215.72 1923.18,-173.32 1923.18,-110.29 1956.22,-77.26 2060.69,-77.26 2079.59,-58.35 U1.B38@2114.21,-58.35
  Signal L2 w4: v1(1203.98,572.73) 1248.12,572.73 1255.37,579.98 1255.37,684.6 1234.2,705.77 896.44,705.77 875.39,684.72 875.39,196.98 944.07,128.3 1096.04,128.3 1147.46,76.88 1147.46,-327.15 1211.77,-391.46 v1(1426.96,-391.46)
  Bottom Layer w15: R95.1@1203.98,560.23 v1(1203.98,572.73)
DCC_1: C2.2 R116.1 U4.1 U18.28 | length 1013.6
  Top Layer w5.6: U18.28@826.31,-23.77 v1@826.31,62.85
  Signal L2 w5.6: v5(636.48,138.74) 636.48,197.28 695.52,256.32 ; 695.52,255.94 695.52,256.32 ; v5(808.92,453.93) 715.73,453.93 695.52,433.73 695.52,256.32 ; v1(826.31,64.18) 748.54,64.18 735.07,77.65 735.07,216.78 695.52,256.32
  Bottom Layer w10: R116.1@616.86,138.73 v5(636.48,138.74) ; v5(808.92,453.93) 878.61,453.93 902.2,477.52 C2.2@902.2,481.02 902.2,511.36 883.03,530.52 U4.1@883.03,540.36
DCC_2: C53.2 R117.1 U18.27 U19.1 | length 691.5
  Top Layer w5.6: U18.27@842.06,-23.77 v1@842.06,73
  Signal L2 w5.6: v5(749.85,253.5) 749.85,86.98 758.77,78.06 v1@841.19,78.06
  Bottom Layer w10: R117.1@616.86,233.03 616.86,233.74 620.86,237.74 734.09,237.74 v5(749.85,253.5) C53.2@883.03,253.5 U19.1@883.03,311.63
  other v1: 842.06,78
DDR_RZQ: R40.1 U1.1F3 | length 266.6
  Bottom Layer w4.1: v1(2341.09,398.21) 2341.16,398.28 2349.68,398.28 ccw(c2349.68,418.63) 2364.07,404.24 2391.5,431.67 ccw(c2382.96,440.2) 2395.03,440.2 2395.03,440.37 cw(c2404.57,440.4) 2397.83,447.15 2485.25,534.57 ccw(c2466.38,553.43) 2493.06,553.47 ccw(c2463.77,553.44) 2484.48,574.15 R40.1@2471.44,587.19
DEBUG_RX: D4.1 R14.1 TP3.1 | length 1230.7
  Top Layer w6: TP3.1@2354.83,-416.77 2353.72,-400.09 2353.72,-280.35 D4.1@2349.99,-269.57 2349.99,-237.95 cw(c2363.75,-237.95) 2363.75,-224.19 v1(2388.35,-224.19)
  Bottom Layer w4.1: R14.1@1865.89,279.7 ccw(c1873.62,279.7) 1868.14,274.24 1915.96,226.42 cw(c1903.66,214.12) 1921.06,214.12 1921.06,176.75 ccw(c1931.78,176.75) 1931.78,166.02 1984.72,166.02 cw(c1984.72,156.33) 1994.41,156.33 1994.41,24.15 ccw(c2020.47,24.15) 2020.47,-1.91 2251.37,-1.91 2279.72,-30.26 2396.64,-30.26 2424.28,-57.9 2424.28,-212.36 cw(c2412.45,-212.36) 2412.45,-224.19 v1@2390.35,-224.19
DEBUG_TX: D5.1 R15.1 TP5.1 | length 1288.5
  Top Layer w4: D5.1@2387.8,-269.57 D5.1@2388.35,-269.02
  Top Layer w6: D5.1@2388.35,-269.02 v1(2388.35,-243.86) ; D5.1@2392.8,-269.57 2387.96,-280.35 2373.34,-294.97 ccw(c2385.1,-306.71) 2368.48,-306.79 2368.48,-369.19 ccw(c2377.89,-369.19) 2377.89,-378.6 2416.99,-378.6 cw(c2416.99,-390.2) 2428.59,-390.2 TP5.1@2428.59,-416.77
  Bottom Layer w4: v1(2388.35,-243.86) 2422.54,-243.87
  Bottom Layer w4.1: R15.1@1883.06,296.1 1883.06,294.53 1935.24,242.35 cw(c1927.51,234.62) 1938.44,234.62 cw(c1927.51,234.62) 1935.25,226.91 1933.91,225.57 ccw(c1944.84,214.63) 1929.38,214.63 1929.38,182.9 ccw(c1937.12,182.9) 1937.12,175.16 1987.63,175.16 cw(c1987.63,160.34) 2002.45,160.37 2002.51,159.69 2003.56,29.63 ccw(c2024.72,29.63) 2003.56,29.29 ccw(c2024.72,29.63) 2015.9,10.39 ccw(c2024.72,29.63) 2020.13,8.97 ccw(c2024.72,29.63) 2024.72,8.47 2256.82,8.47 2285.91,-20.63 2402.15,-20.63 2435.08,-53.56 2435.08,-231.34 cw(c2422.54,-231.34) 2422.54,-243.87
DIY_LED: Q8.1 R41.1 R86.2 | length 90.5
  Bottom Layer w10: R41.1@1946.41,714.98 R41.1@1948.16,713.23 1986.56,713.23 1987.47,712.32 Q8.1@1987.47,705.5 1987.81,705.84 1987.81,746.38 R86.2@1988.16,746.73
eMMC_CLK: R53.1 U3.M6 | length 840.7
  Signal L2 w4.7: v1(2215.33,-104.98) 2224.01,-104.98 cw(c2224.01,-110.83) 2229.86,-110.83 2229.86,-235.85 ccw(c2250.12,-235.85) 2250.12,-256.12 2259.65,-256.12 ccw(c2259.65,-249.77) 2266,-249.77 2266,-236.59 cw(c2272.35,-236.59) 2278.7,-236.59 2278.7,-249.88 ccw(c2285.05,-249.88) 2291.4,-249.88 2291.4,-236.59 cw(c2297.75,-236.59) 2304.1,-236.59 2304.1,-249.88 ccw(c2310.45,-249.88) 2316.8,-249.88 2316.8,-236.59 cw(c2323.15,-236.59) 2329.5,-236.59 2329.5,-249.88 ccw(c2335.85,-249.88) 2342.2,-249.88 2342.2,-236.59 cw(c2348.55,-236.59) 2354.9,-236.59 2354.9,-249.77 ccw(c2361.25,-249.77) 2361.25,-256.12 2412.05,-256.12 ccw(c2412.05,-249.77) 2418.4,-249.77 2418.4,-239.03 cw(c2424.75,-239.03) 2431.1,-239.03 2431.1,-249.88 ccw(c2437.45,-249.88) 2443.8,-249.88 2443.8,-239.03 cw(c2450.15,-239.03) 2456.5,-239.03 2456.5,-249.77 ccw(c2462.85,-249.77) 2462.85,-256.12 2495.71,-256.12 ccw(c2495.71,-244.98) 2506.85,-244.98 v1@2506.85,-96.43
  Bottom Layer w4.2: v1@2215.25,-104.59 U3.M6@2215.25,-86.47
  other v1: 2506.85,-96.67
eMMC_CMD: R106.2 U1.A27 U3.M5 | length 874
  Top Layer w4.2: U1.A27@2247.83,53 2332.82,-31.99 ccw(c2343.81,-21.04) 2343.78,-36.55 2464.38,-36.55 2479.75,-36.57 ; 2479.79,-36.57 cw(c2479.8,-45.21) 2488.44,-45.19 ; v1@2488.44,-73.58 2488.44,-45.22
  Signal L1 w4.7: v1(2195.64,-104.98) 2195.64,-197.32 ccw(c2208.3,-197.32) 2208.3,-209.97 v1(2247.91,-209.98)
  Signal L2 w4.7: v1(2247.91,-209.98) 2401.22,-209.98 ccw(c2401.22,-203.63) 2407.57,-203.63 2407.57,-197.04 cw(c2413.92,-197.04) 2420.27,-197.04 2420.27,-203.16 ccw(c2427.08,-203.16) 2427.08,-209.98 2469.35,-209.98 ccw(c2469.35,-190.86) 2488.47,-190.86 v1(2488.47,-76.6)
  Bottom Layer w4.2: v1(2195.64,-104.98) U3.M5@2195.64,-86.39
eMMC_DATA0: pad.2 R105.2 U1.A32 U3.A3 | length 938.3
  Top Layer w4.2: v1(2156.31,-315.82) 2156.31,-349.75 ccw(c2163.59,-349.75) 2163.59,-357.02 2172.07,-357.02 ccw(c2172.07,-350.69) 2174.03,-356.71 ccw(c2172.27,-351.31) 2177.95,-351.31 2177.95,-309.64 2177.95,-309.59 cw(c2184.18,-309.56) 2190.4,-309.65 2190.4,-309.81 2190.4,-350.1 ccw(c2196.61,-350.13) 2193.77,-355.64 ccw(c2196.47,-350.39) 2202.35,-350.89 ; U1.A32@2192.15,-2.67 2226.35,-36.88 ccw(c2242.09,-21.14) 2242.09,-43.4 2261.96,-43.4 cw(c2261.94,-64.22) 2276.7,-49.53 2294.43,-67.25 cw(c2287.36,-74.33) 2297.36,-74.33 2297.36,-80.22 cw(c2291.9,-80.22) 2295.77,-84.06 ; 2202.37,-350.58 2202.37,-325.18 ; 2202.37,-325.15 cw(c2208.59,-325.18) 2214.82,-325.23 ; 2214.82,-352.5 ccw(c2220.74,-352.5) 2220.7,-358.42 ccw(c2220.82,-352.22) 2227.02,-352.27 2227.02,-308.96 cw(c2233.03,-308.96) 2233.03,-302.95 2240.43,-302.95 ccw(c2240.43,-298.59) 2244.79,-298.59 R105.2@2244.79,-268.42 2237.89,-261.52 2237.89,-257.8 2230.97,-250.87 ; 2214.82,-352.47 2214.82,-325.27 ; 2220.31,-89.36 2210.67,-89.36 cw(c2210.67,-82.92) 2204.24,-82.92 2204.24,-61.24 cw(c2210.5,-61.24) 2210.5,-54.98 2220.66,-54.98 cw(c2220.66,-61.13) 2226.81,-61.13 2226.81,-73.28 ccw(c2232.96,-73.28) 2239.11,-73.28 2239.11,-61.13 cw(c2245.26,-61.13) 2251.41,-61.13 2251.41,-73.12 ccw(c2257.56,-73.12) 2263.71,-73.12 2263.71,-70.97 cw(c2269.86,-70.97) 2276.01,-70.97 2276.01,-78.14 ccw(c2283.54,-78.14) 2283.54,-85.67 2291.9,-85.67 ccw(c2291.9,-80.22) 2295.75,-84.08 ; 2220.37,-89.36 cw(c2220.19,-97.4) 2228.23,-97.4 2228.23,-244.27 ccw(c2237.57,-244.27) 2230.96,-250.86
  Bottom Layer w4.2: v1@2156.29,-315.8 U3.A3@2156.29,-302.95
eMMC_DATA1: U1.B27 U3.A4 | length 938.5
  Top Layer w4.2: U1.B27@2236.7,64.14 2236.7,58.18 2236.87,52.67 ccw(c2247.83,53) 2240.05,45.26 2328.93,-43.61 ccw(c2342.96,-29.59) 2341.48,-49.37 ccw(c2342.96,-29.59) 2342.95,-49.42 2433.89,-49.42 2455.51,-49.42 cw(c2455.51,-55.41) 2461.5,-55.41 v1(2461.5,-69.14)
  Bottom Layer w4.2: U3.A4@2175.96,-302.93 2175.96,-323.08 ccw(c2187.04,-323.08) 2187.04,-334.17 2379.07,-334.17 cw(c2379.07,-340.27) 2385.17,-340.27 2385.17,-349.73 ccw(c2391.27,-349.73) 2397.37,-349.73 2397.37,-338.42 cw(c2403.47,-338.42) 2409.57,-338.42 2409.57,-349.73 ccw(c2415.67,-349.73) 2421.77,-349.73 2421.77,-340.27 cw(c2427.87,-340.27) 2427.87,-334.17 2450.63,-334.17 ccw(c2450.63,-323.29) 2461.5,-323.29 v1(2461.5,-69.14)
eMMC_DATA2: U1.B32 U3.A5 | length 860.4
  Top Layer w4.2: U1.B32@2181.02,8.46 2192.31,8.3 cw(c2192.15,-2.67) 2199.64,5.35 cw(c2192.15,-2.67) 2200.16,4.83 ccw(c2203.13,7.66) 2200.2,4.78 2229.41,-24.42 ccw(c2242.82,-11.01) 2242.82,-29.98 v3(2249.86,-29.98)